# EAGLE board mem3-c (EAGLE 6.5.0)
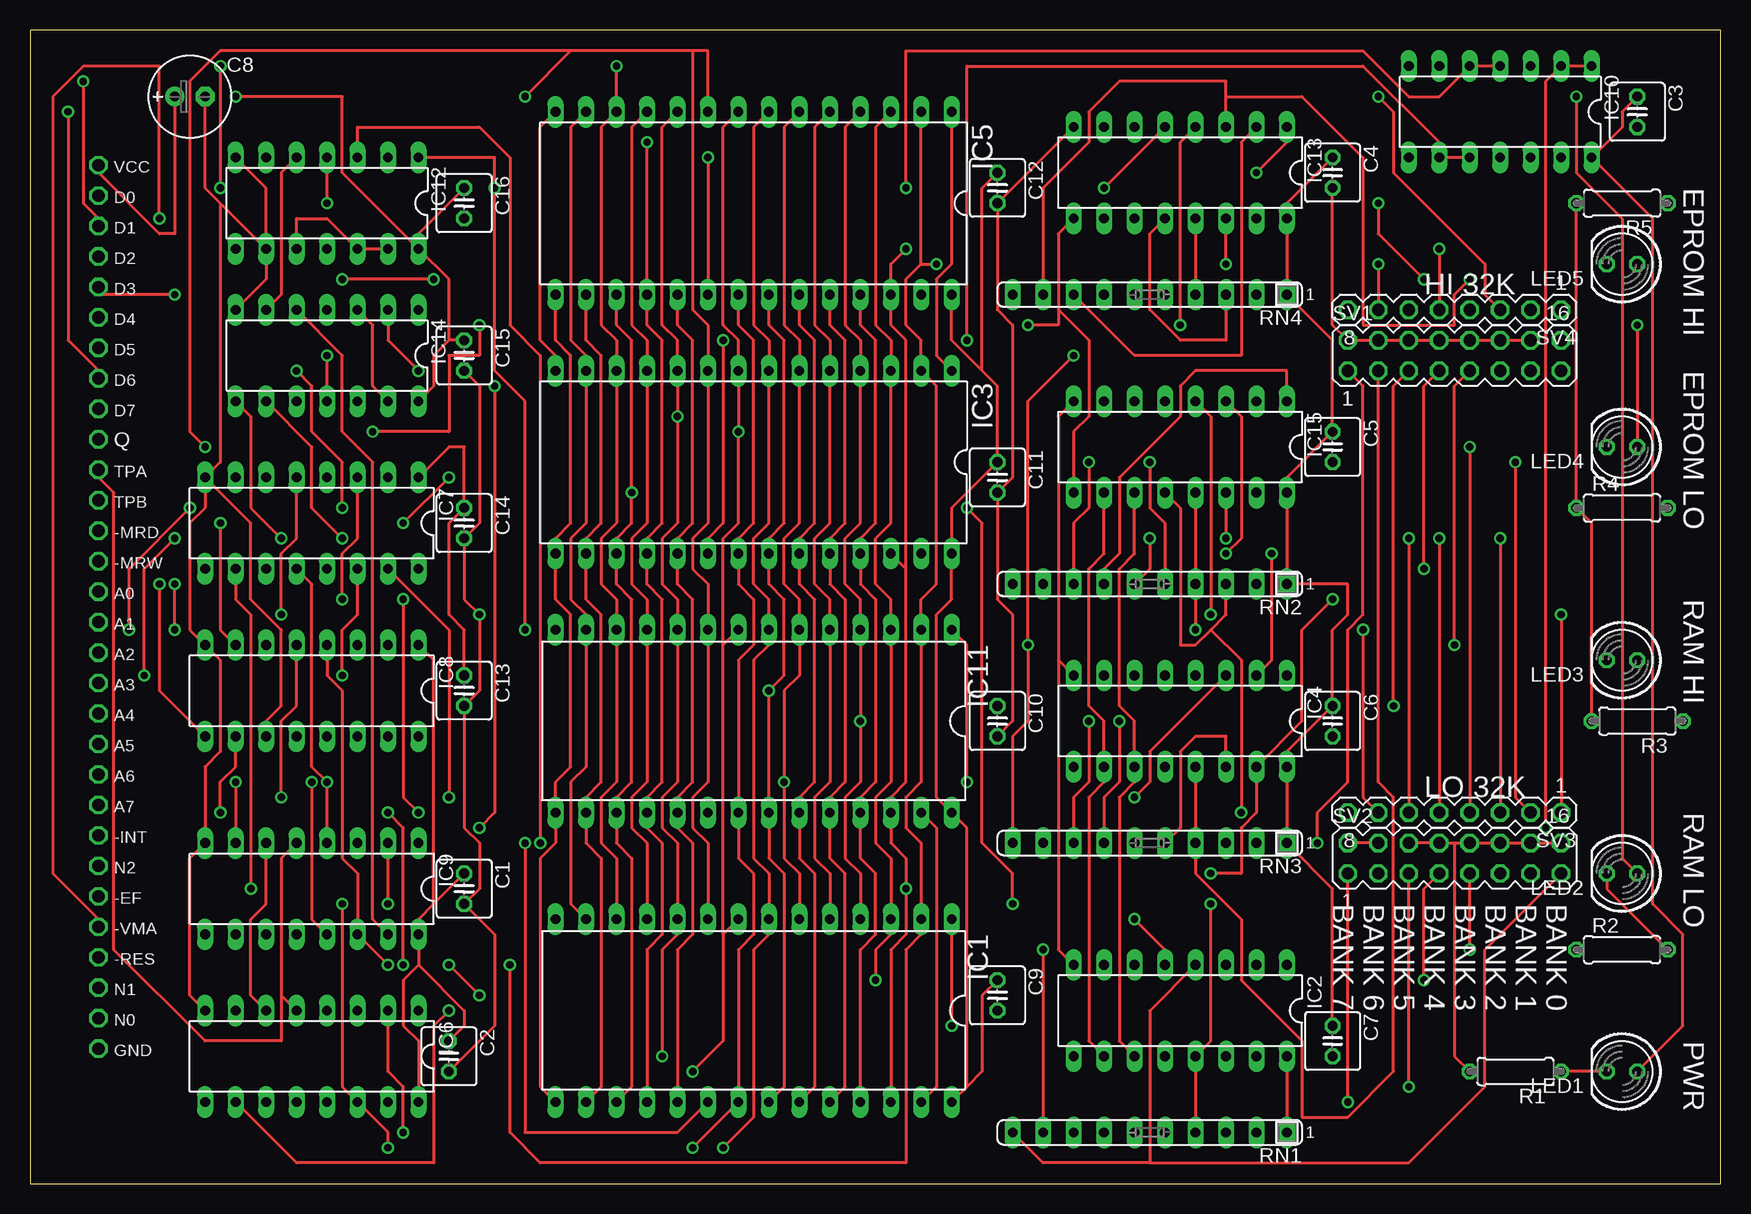
[diagram p0: board, top side]
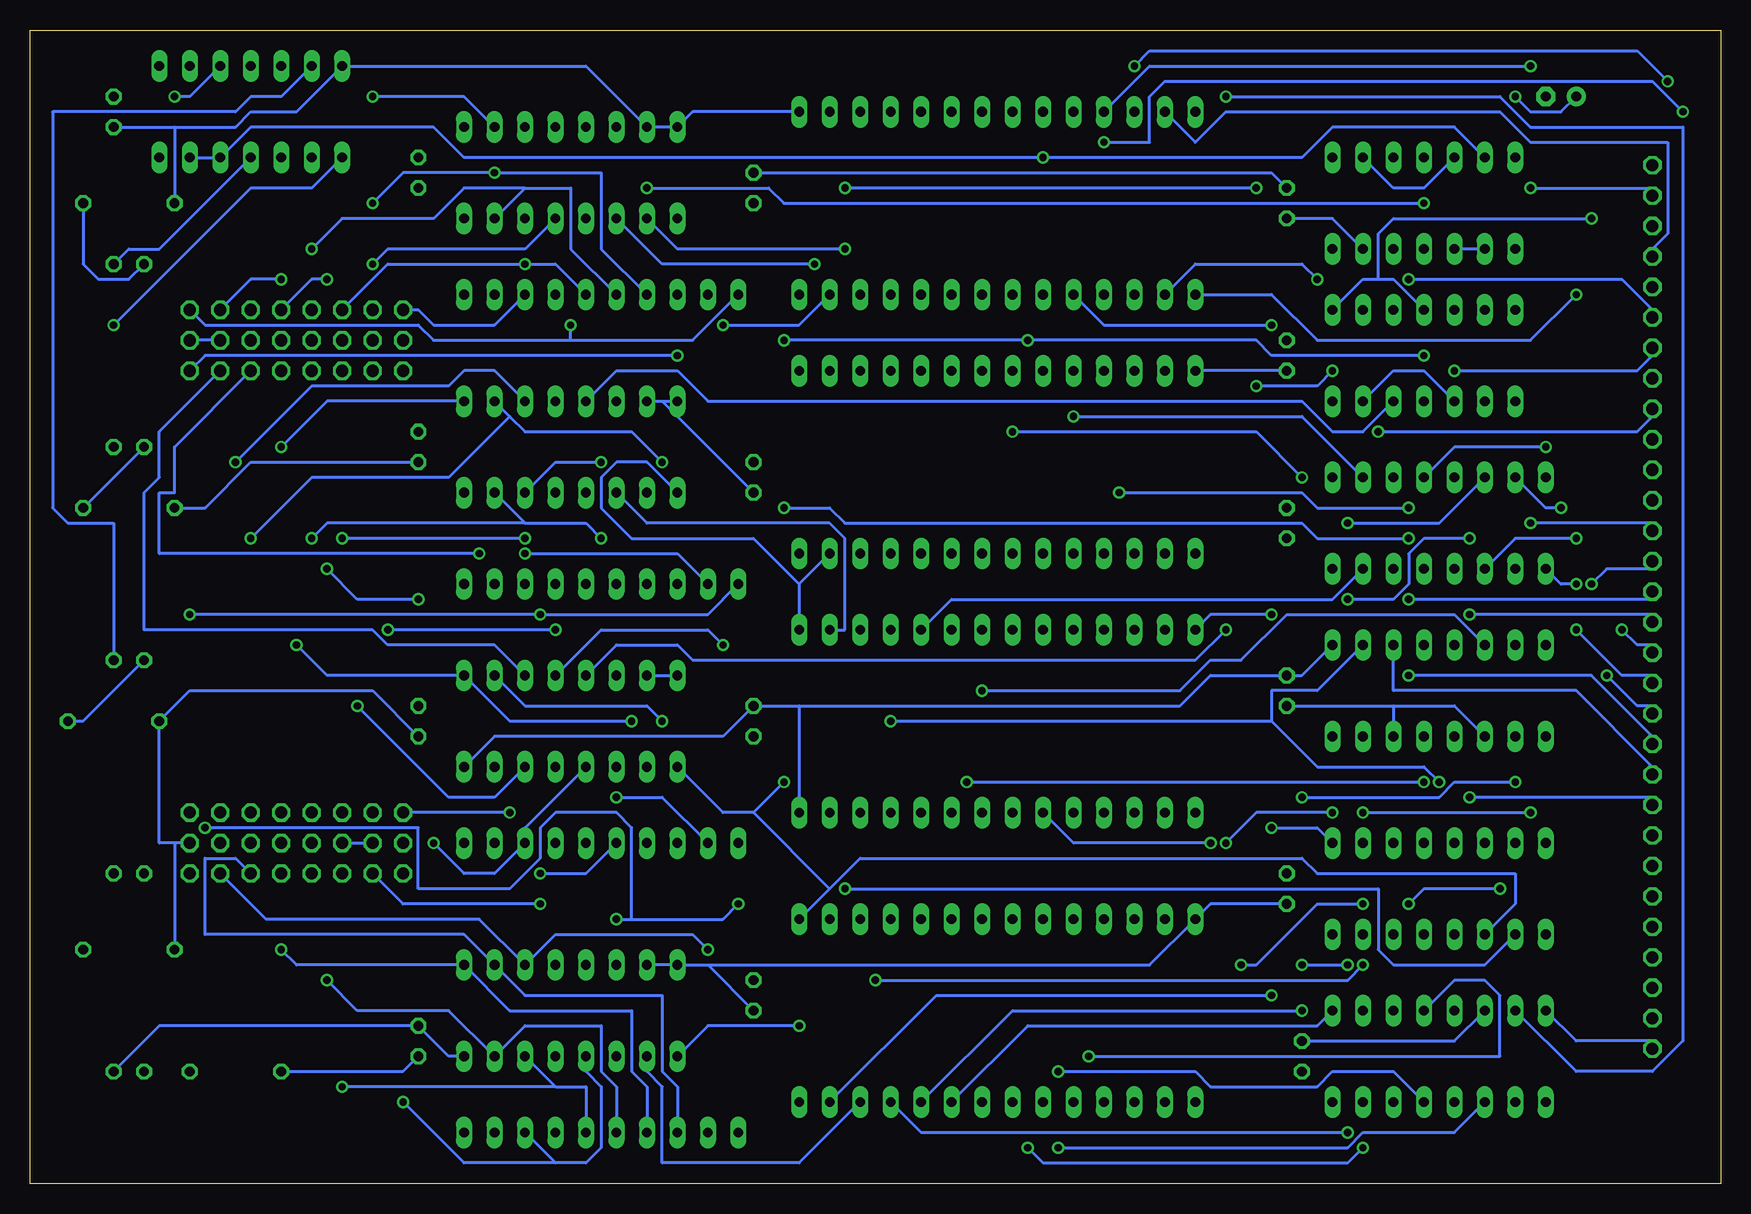
[diagram p1: board, bottom side, seen from below]

Size 140.95 x 96.19 mm. Coordinates in mm from the lower left corner, seen from the top.
Outline: 0,0 140.95,0 140.95,96.19 0,96.19 0,0
Copper layers (1*16): Top 0.035mm / dielectric 1.5mm / Bottom 0.035mm
Design rules "default": minimum track width 10mil, minimum drill 24mil, track to track 8mil, track to pad 8mil, pad to pad 8mil, via to via 8mil, smd to smd 8mil, copper to edge 40mil, drill to drill 8mil, minimum pad ring 10mil, minimum via ring 8mil, stop-mask expansion 4mil, vias tented up to drill 0mil, thermal gap 10mil

## Footprints (pad centres in the part's own frame; a part is rotated, then mirrored left to right if it is on the bottom)
C025-050X050 = drill 0.813 octagon: 1 -1.27,0; 2 1.27,0
E2,5-7 = drill 0.813 pad 1.6: + -1.27,0 | drill 0.813 pad 1.6 octagon: - 1.27,0
DIL28-6 = drill 0.813 long: 1 -16.51,-7.62; 2 -13.97,-7.62; 3 -11.43,-7.62; 4 -8.89,-7.62; 5 -6.35,-7.62; 6 -3.81,-7.62; 7 -1.27,-7.62; 8 1.27,-7.62; 9 3.81,-7.62; 10 6.35,-7.62; 11 8.89,-7.62; 12 11.43,-7.62; 13 13.97,-7.62; 14 16.51,-7.62; 15 16.51,7.62; 16 13.97,7.62; 17 11.43,7.62; 18 8.89,7.62; 19 6.35,7.62; 20 3.81,7.62; 21 1.27,7.62; 22 -1.27,7.62; 23 -3.81,7.62; 24 -6.35,7.62; 25 -8.89,7.62; 26 -11.43,7.62; 27 -13.97,7.62; 28 -16.51,7.62
DIL16 = drill 0.813 long: 1 -8.89,-3.81; 2 -6.35,-3.81; 3 -3.81,-3.81; 4 -1.27,-3.81; 5 1.27,-3.81; 6 3.81,-3.81; 7 6.35,-3.81; 8 8.89,-3.81; 9 8.89,3.81; 10 6.35,3.81; 11 3.81,3.81; 12 1.27,3.81; 13 -1.27,3.81; 14 -3.81,3.81; 15 -6.35,3.81; 16 -8.89,3.81
DIL28 = drill 0.813 long: 1 -16.51,-7.62; 2 -13.97,-7.62; 3 -11.43,-7.62; 4 -8.89,-7.62; 5 -6.35,-7.62; 6 -3.81,-7.62; 7 -1.27,-7.62; 8 1.27,-7.62; 9 3.81,-7.62; 10 6.35,-7.62; 11 8.89,-7.62; 12 11.43,-7.62; 13 13.97,-7.62; 14 16.51,-7.62; 15 16.51,7.62; 16 13.97,7.62; 17 11.43,7.62; 18 8.89,7.62; 19 6.35,7.62; 20 3.81,7.62; 21 1.27,7.62; 22 -1.27,7.62; 23 -3.81,7.62; 24 -6.35,7.62; 25 -8.89,7.62; 26 -11.43,7.62; 27 -13.97,7.62; 28 -16.51,7.62
DIL14 = drill 0.813 long: 1 -7.62,-3.81; 2 -5.08,-3.81; 3 -2.54,-3.81; 4 0,-3.81; 5 2.54,-3.81; 6 5.08,-3.81; 7 7.62,-3.81; 8 7.62,3.81; 9 5.08,3.81; 10 2.54,3.81; 11 0,3.81; 12 -2.54,3.81; 13 -5.08,3.81; 14 -7.62,3.81
LED5MM = drill 0.813 octagon: A -1.27,0; K 1.27,0
0207/7 = drill 0.813 octagon: 1 -3.81,0; 2 3.81,0
SIL10 = drill 0.813 long: 1 -11.43,0; 2 -8.89,0; 3 -6.35,0; 4 -3.81,0; 5 -1.27,0; 6 1.27,0; 7 3.81,0; 8 6.35,0; 9 8.89,0; 10 11.43,0
MA08-2 = drill 1.016 octagon: 1 -8.89,-1.27; 2 -8.89,1.27; 3 -6.35,-1.27; 4 -6.35,1.27; 5 -3.81,-1.27; 6 -3.81,1.27; 7 -1.27,-1.27; 8 -1.27,1.27; 9 1.27,-1.27; 10 1.27,1.27; 11 3.81,-1.27; 12 3.81,1.27; 13 6.35,-1.27; 14 6.35,1.27; 15 8.89,-1.27; 16 8.89,1.27
MA08-1 = drill 1.016 octagon: 1 -8.89,0; 2 -6.35,0; 3 -3.81,0; 4 -1.27,0; 5 1.27,0; 6 3.81,0; 7 6.35,0; 8 8.89,0
C30 = drill 1.016 octagon: 1 -36.83,0; 2 -34.29,0; 3 -31.75,0; 4 -29.21,0; 5 -26.67,0; 6 -24.13,0; 7 -21.59,0; 8 -19.05,0; 9 -16.51,0; 10 -13.97,0; 11 -11.43,0; 12 -8.89,0; 13 -6.35,0; 14 -3.81,0; 15 -1.27,0; 16 1.27,0; 17 3.81,0; 18 6.35,0; 19 8.89,0; 20 11.43,0; 21 13.97,0; 22 16.51,0; 23 19.05,0; 24 21.59,0; 25 24.13,0; 26 26.67,0; 27 29.21,0; 28 31.75,0; 29 34.29,0; 30 36.83,0

## Placement (x,y rotation side)
C1  .1  [C025-050X050]  36.19,24.6 270 top
C2  .1  [C025-050X050]  34.92,10.63 270 top
C3  .1  [C025-050X050]  133.98,89.37 270 top
C4  .1  [C025-050X050]  108.58,84.29 270 top
C5  .1  [C025-050X050]  108.58,61.43 270 top
C6  .1  [C025-050X050]  108.58,38.57 270 top
C7  .1  [C025-050X050]  108.58,11.9 270 top
C8  10.0  [E2,5-7]  13.33,90.64 0 top
C9  .1  [C025-050X050]  80.64,15.71 270 top
C10  .1  [C025-050X050]  80.64,38.57 270 top
C11  .1  [C025-050X050]  80.64,58.89 270 top
C12  .1  [C025-050X050]  80.64,83.02 270 top
C13  .1  [C025-050X050]  36.19,41.11 270 top
C14  .1  [C025-050X050]  36.19,55.08 270 top
C15  .1  [C025-050X050]  36.19,69.05 270 top
C16  .1  [C025-050X050]  36.19,81.75 270 top
IC1  62256  [DIL28-6]  60.32,14.44 180 top
IC2  74LS151N  [DIL16]  95.88,14.44 180 top
IC3  27256  [DIL28]  60.32,60.16 180 top
IC4  74LS151N  [DIL16]  95.88,38.57 180 top
IC5  27256  [DIL28]  60.32,81.75 180 top
IC6  4042N  [DIL16]  23.49,10.63 180 top
IC7  4050N  [DIL16]  23.49,55.08 180 top
IC8  4050N  [DIL16]  23.49,41.11 180 top
IC9  4042N  [DIL16]  23.49,24.6 180 top
IC10  74LS00N  [DIL14]  122.55,89.37 180 top
IC11  62256  [DIL28-6]  60.32,38.57 180 top
IC12  74LS32N  [DIL14]  24.76,81.75 180 top
IC13  74LS151N  [DIL16]  95.88,84.29 180 top
IC14  74LS32N  [DIL14]  24.76,69.05 180 top
IC15  74LS151N  [DIL16]  95.88,61.43 180 top
LED1  [LED5MM]  132.71,9.36 180 top
LED2  [LED5MM]  132.71,25.87 180 top
LED3  [LED5MM]  132.71,43.65 180 top
LED4  [LED5MM]  132.71,61.43 180 top
LED5  [LED5MM]  132.71,76.67 180 top
R1  470  [0207/7]  123.82,9.36 180 top
R2  470  [0207/7]  132.71,19.52 0 top
R3  470  [0207/7]  133.98,38.57 180 top
R4  470  [0207/7]  132.71,56.35 0 top
R5  470  [0207/7]  132.71,81.75 180 top
RN1  [SIL10]  93.34,4.28 180 top
RN2  [SIL10]  93.34,50 180 top
RN3  [SIL10]  93.34,28.41 180 top
RN4  [SIL10]  93.34,74.13 180 top
SV1  [MA08-2]  118.74,69.05 0 top
SV2  [MA08-2]  118.74,27.14 0 top
SV3  [MA08-1]  118.74,30.95 180 top
SV4  [MA08-1]  118.74,72.86 180 top
U$1  [C30]  5.71,48.09 270 top

## Library data of the parts
C1-C16 R1-R5 = rcl
IC1 IC11 = memory-hitachi
IC2 IC4 IC10 IC12-IC15 = 74xx-us
IC3 IC5 = memory
IC6-IC9 = 40xx
LED1-LED5 = led
RN1-RN4 = resistor-sil
SV1-SV4 = con-lstb
U$1 = k1

## Nets
BUFFADDR0: IC1.10 IC3.10 IC5.10 IC6.4 IC7.2 IC11.10
BUFFADDR1: IC1.9 IC3.9 IC5.9 IC6.7 IC7.4 IC11.9
BUFFADDR2: IC1.8 IC3.8 IC5.8 IC6.13 IC7.6 IC11.8
BUFFADDR3: IC1.7 IC3.7 IC5.7 IC6.14 IC7.10 IC11.7
BUFFADDR4: IC1.6 IC3.6 IC5.6 IC7.12 IC9.4 IC11.6
BUFFADDR5: IC1.5 IC3.5 IC5.5 IC7.15 IC9.7 IC11.5
BUFFADDR6: IC1.4 IC3.4 IC5.4 IC8.2 IC9.13 IC11.4
BUFFADDR7: IC1.3 IC3.3 IC5.3 IC8.4 IC9.14 IC11.3
BUFFADDR8: IC1.25 IC3.25 IC5.25 IC6.2 IC11.25
BUFFADDR9: IC1.24 IC3.24 IC5.24 IC6.10 IC11.24
BUFFADDR10: IC1.21 IC3.21 IC5.21 IC6.11 IC11.21
BUFFADDR11: IC1.23 IC3.23 IC5.23 IC6.1 IC11.23
BUFFADDR12: IC1.2 IC2.11 IC3.2 IC4.11 IC5.2 IC9.2 IC11.2 IC13.11 IC15.11
BUFFADDR13: IC1.26 IC2.10 IC3.26 IC4.10 IC5.26 IC9.10 IC11.26 IC13.10 IC15.10
BUFFADDR14: IC1.1 IC2.9 IC3.27 IC4.9 IC5.27 IC9.11 IC11.1 IC13.9 IC15.9
BUFFADDR15: IC9.1 IC14.2
BUSDATA0: IC1.11 IC3.11 IC5.11 IC11.11 U$1.2
BUSDATA1: IC1.12 IC3.12 IC5.12 IC11.12 U$1.3
BUSDATA2: IC1.13 IC3.13 IC5.13 IC11.13 U$1.4
BUSDATA3: IC1.15 IC3.15 IC5.15 IC11.15 U$1.5
BUSDATA4: IC1.16 IC3.16 IC5.16 IC11.16 U$1.6
BUSDATA5: IC1.17 IC3.17 IC5.17 IC11.17 U$1.7
BUSDATA6: IC1.18 IC3.18 IC5.18 IC11.18 U$1.8
BUSDATA7: IC1.19 IC3.19 IC5.19 IC11.19 U$1.9
GND: C1.2 C2.2 C3.2 C4.2 C5.2 C6.2 C7.2 C8.- C9.2 C10.2 C11.2 C12.2 C13.2 C14.2 C15.2 C16.2 IC1.14 IC2.7 IC2.8 IC3.1 IC3.14 IC4.7 IC4.8 IC5.1 IC5.14 IC6.8 IC7.8 IC8.8 IC8.11 IC8.14 IC9.8 IC10.7 IC11.14 IC12.7 IC12.9 IC12.10 IC12.12 IC12.13 IC13.7 IC13.8 IC14.7 IC15.7 IC15.8 R1.2 R2.1 R3.2 R4.1 R5.2 SV1.2 SV1.4 SV1.6 SV1.8 SV1.10 SV1.12 SV1.14 SV1.16 SV2.2 SV2.4 SV2.6 SV2.8 SV2.10 SV2.12 SV2.14 SV2.16 U$1.30
N$1: LED1.K R1.1
N$2: IC2.12 RN1.3 SV2.1
N$3: IC2.13 RN1.4 SV2.3
N$4: IC2.14 RN1.5 SV2.5
N$5: IC6.5 IC9.5 U$1.11
N$6: IC2.15 RN1.6 SV2.7
N$7: IC7.3 U$1.15
N$8: IC7.5 U$1.16
N$9: IC7.7 U$1.17
N$10: IC7.9 U$1.18
N$11: IC7.11 U$1.19
N$12: IC7.14 U$1.20
N$13: IC8.3 U$1.21
N$14: IC8.5 U$1.22
N$15: IC2.1 RN1.7 SV2.9
N$16: IC2.2 RN1.8 SV2.11
N$17: IC2.3 RN1.9 SV2.13
N$18: IC2.4 RN1.10 SV2.15
N$19: IC10.8 LED4.A
N$20: IC12.2 IC12.5 IC14.6
N$21: IC4.12 RN3.3 SV1.1
N$22: IC4.13 RN3.4 SV1.3
N$23: IC4.14 RN3.5 SV1.5
N$24: IC4.15 RN3.6 SV1.7
N$25: IC8.9 U$1.14
N$26: IC8.7 U$1.13
N$27: IC14.1 IC14.4 U$1.26
N$28: IC4.1 RN3.7 SV1.9
N$29: IC4.2 RN3.8 SV1.11
N$30: IC4.3 RN3.9 SV1.13
N$31: IC14.3 IC14.10 IC14.13
N$32: LED4.K R4.2
N$33: IC4.4 RN3.10 SV1.15
N$34: IC2.5 IC10.1 IC10.2 IC14.9
N$35: IC1.20 IC14.8
N$36: IC14.12 IC15.5
N$37: IC5.20 IC10.12 IC10.13 IC12.6
N$38: IC13.13 RN4.4 SV4.7
N$39: IC13.14 RN4.5 SV4.6
N$40: IC13.15 RN4.6 SV4.5
N$41: IC13.1 RN4.7 SV4.4
N$42: IC13.2 RN4.8 SV4.3
N$43: IC13.3 RN4.9 SV4.2
N$44: IC3.20 IC10.9 IC10.10 IC14.11
N$45: IC13.12 RN4.3 SV4.8
N$46: IC13.4 RN4.10 SV4.1
N$47: IC11.20 IC12.3
N$49: IC12.4 IC13.5
N$50: IC9.15 IC14.5
N$51: IC4.5 IC10.4 IC10.5 IC12.1
N$55: IC15.12 RN2.3 SV3.8
N$56: LED5.K R5.1
N$57: IC10.11 LED5.A
N$58: IC10.3 LED2.A
N$59: LED2.K R2.2
N$60: IC15.13 RN2.4 SV3.7
N$61: LED3.K R3.1
N$62: IC10.6 LED3.A
N$63: IC15.14 RN2.5 SV3.6
N$64: IC15.15 RN2.6 SV3.5
N$65: IC15.1 RN2.7 SV3.4
N$66: IC15.2 RN2.8 SV3.3
N$67: IC15.3 RN2.9 SV3.2
N$68: IC15.4 RN2.10 SV3.1
RD: IC1.22 IC3.22 IC5.22 IC8.6 IC11.22
VCC: C1.1 C2.1 C3.1 C4.1 C5.1 C6.1 C7.1 C8.+ C9.1 C10.1 C11.1 C12.1 C13.1 C14.1 C15.1 C16.1 IC1.28 IC2.16 IC3.28 IC4.16 IC5.28 IC6.6 IC6.16 IC7.1 IC8.1 IC9.6 IC9.16 IC10.14 IC11.28 IC12.14 IC13.16 IC14.14 IC15.16 LED1.A RN1.1 RN2.1 RN3.1 RN4.1 U$1.1
WR: IC1.27 IC8.10 IC11.27

## Tracks (layer width: path | path; a pad name or v marks a point on that pad's centre or on a via)
BUFFADDR0  (via drill 0.61)
  Top 0.254: v52.7,10.63 52.7,19.52 53.97,20.79 IC1.10 53.97,28.41 52.7,29.68 52.7,32.22 53.97,33.49 IC11.10 53.97,48.73 52.7,50 52.7,53.81 53.97,55.08 v53.97,63.97 IC3.10 53.97,70.32 52.7,71.59 52.7,88.1 IC5.10
  Bottom 0.254: IC6.4 22.22,16.98 19.68,16.98 18.41,15.71 18.41,10.63 v52.7,10.63 | IC7.2 34.92,63.97 v53.97,63.97
BUFFADDR1  (via drill 0.61)
  Top 0.254: IC1.9 56.51,28.41 55.24,29.68 55.24,32.22 56.51,33.49 IC11.9 56.51,50 55.24,51.27 55.24,53.81 56.51,55.08 IC3.9 56.51,71.59 55.24,72.86 55.24,94.45 | 45.08,94.45 v41.27,90.64 | 55.24,94.45 56.51,94.45 IC5.9 | 55.24,94.45 45.08,94.45 | v14.6,61.43 13.33,62.7 13.33,91.91 15.87,94.45 45.08,94.45
  Bottom 0.254: IC6.7 12.06,9.36 5.71,9.36 3.17,11.9 3.17,88.1 15.87,88.1 18.41,90.64 v41.27,90.64 | IC7.4 22.22,61.43 v14.6,61.43
BUFFADDR2  (via drill 0.61)
  Top 0.254: v34.92,58.89 v31.11,55.08 | IC5.8 57.78,88.1 57.78,71.59 59.05,70.32 IC3.8 v59.05,62.7 59.05,55.08 57.78,53.81 57.78,44.92 | v55.24,9.36 57.78,11.9 57.78,20.79 | IC1.8 57.78,20.79 | 57.78,44.92 IC11.8 | 57.78,20.79 57.78,44.92
  Bottom 0.254: IC7.6 23.49,55.08 v31.11,55.08 | v34.92,58.89 38.73,62.7 v59.05,62.7 | IC6.13 27.3,9.36 32.38,9.36 33.65,8.09 42.54,8.09 43.81,9.36 v55.24,9.36
BUFFADDR3  (via drill 0.61)
  Top 0.254: v26.03,23.33 26.03,8.09 IC6.14 29.84,4.28 v29.84,3.01 | v18.41,24.6 18.41,47.46 17.14,48.73 IC7.10 | IC5.7 60.32,88.1 60.32,71.59 61.59,70.32 IC3.7 61.59,55.08 60.32,53.81 60.32,50 61.59,48.73 IC11.7 61.59,44.92 60.32,43.65 60.32,27.14 61.59,25.87 IC1.7 61.59,20.79 60.32,19.52 60.32,5.55 v57.78,3.01
  Bottom 0.254: v26.03,23.33 24.76,24.6 v18.41,24.6 | v29.84,3.01 31.11,1.74 56.51,1.74 v57.78,3.01
BUFFADDR4  (via drill 0.61)
  Top 0.254: IC7.12 23.49,50 23.49,34.76 v24.76,33.49 IC9.4 | IC5.6 62.86,88.1 62.86,71.59 64.13,70.32 IC3.6 64.13,55.08 62.86,53.81 62.86,50 64.13,48.73 IC11.6 64.13,42.38 62.86,41.11 v62.86,33.49 62.86,27.14 64.13,25.87 IC1.6
  Bottom 0.254: v62.86,33.49 v24.76,33.49
BUFFADDR5  (via drill 0.61)
  Top 0.254: v17.14,33.49 IC9.7 | v34.92,32.22 34.92,46.19 IC7.15 | IC5.5 65.4,88.1 65.4,71.59 66.67,70.32 IC3.5 66.67,55.08 65.4,53.81 65.4,50 66.67,48.73 IC11.5 66.67,33.49 65.4,32.22 65.4,27.14 66.67,25.87 IC1.5
  Bottom 0.254: v17.14,33.49 22.22,33.49 23.49,32.22 v34.92,32.22 | IC7.15 32.38,48.73 64.13,48.73 IC11.5
BUFFADDR6  (via drill 0.61)
  Top 0.254: IC9.13 23.49,22.06 v23.49,33.49 | IC5.4 67.94,88.1 67.94,71.59 69.21,70.32 IC3.4 69.21,55.08 67.94,53.81 67.94,50 69.21,48.73 IC11.4 v69.21,38.57 69.21,33.49 67.94,32.22 67.94,27.14 69.21,25.87 IC1.4
  Bottom 0.254: v23.49,33.49 24.76,34.76 33.65,34.76 37.46,38.57 | 37.46,38.57 37.46,41.11 33.65,41.11 IC8.2 | v69.21,38.57 37.46,38.57
BUFFADDR7  (via drill 0.61)
  Top 0.254: IC8.4 24.76,42.38 26.03,41.11 26.03,27.14 27.3,25.87 IC9.14 v29.84,18.25 | IC5.3 70.48,88.1 70.48,71.59 71.75,70.32 IC3.3 71.75,55.08 70.48,53.81 70.48,50 71.75,48.73 IC11.3 71.75,33.49 70.48,32.22 70.48,28.41 71.75,27.14 IC1.3 71.75,20.79 70.48,19.52 v70.48,16.98
  Bottom 0.254: v29.84,18.25 31.11,16.98 v70.48,16.98
BUFFADDR8  (via drill 0.61)
  Top 0.254: IC5.25 69.21,71.59 70.48,70.32 70.48,55.08 69.21,53.81 IC3.25 69.21,50 70.48,48.73 70.48,33.49 69.21,32.22 IC11.25 69.21,27.14 70.48,25.87 70.48,20.79 69.21,19.52 IC1.25 | IC6.2 29.84,9.36 31.11,8.09 v31.11,4.28
  Bottom 0.254: v31.11,4.28 66.67,4.28 IC1.25
BUFFADDR9  (via drill 0.61)
  Top 0.254: IC5.24 66.67,71.59 67.94,70.32 67.94,55.08 66.67,53.81 IC3.24 66.67,50 67.94,48.73 67.94,33.49 66.67,32.22 IC11.24 66.67,27.14 67.94,25.87 67.94,8.09 IC1.24 | IC6.10 22.22,1.74 33.65,1.74 33.65,13.17 v34.92,14.44
  Bottom 0.254: v34.92,14.44 59.05,14.44 IC1.24
BUFFADDR10  (via drill 0.61)
  Top 0.254: v55.24,3.01 IC1.21 59.05,19.52 60.32,20.79 60.32,25.87 59.05,27.14 IC11.21 59.05,43.65 60.32,44.92 60.32,48.73 59.05,50 IC3.21 59.05,53.81 60.32,55.08 60.32,70.32 59.05,71.59 IC5.21
  Bottom 0.254: IC6.11 22.22,4.28 29.84,4.28 31.11,3.01 v55.24,3.01
BUFFADDR11
  Top 0.254: IC1.23 65.4,8.09 65.4,25.87 64.13,27.14 IC11.23 64.13,32.22 65.4,33.49 65.4,48.73 64.13,50 IC3.23 64.13,53.81 65.4,55.08 65.4,70.32 64.13,71.59 IC5.23
  Bottom 0.254: IC6.1 33.65,13.17 57.78,13.17 IC1.23
BUFFADDR12  (via drill 0.61)
  Top 0.254: IC2.11 90.8,11.9 90.8,32.22 92.07,33.49 IC4.11 92.07,38.57 90.8,39.84 90.8,51.27 92.07,52.54 IC15.11 | v29.84,23.33 IC9.2 | v40,18.25 40,4.28 42.54,1.74 73.02,1.74 73.02,19.52 74.29,20.79 IC1.2 74.29,28.41 73.02,29.68 73.02,32.22 74.29,33.49 IC11.2 74.29,48.73 75.56,50 75.56,66.51 IC3.2 74.29,70.32 73.02,71.59 73.02,75.4 74.29,76.67 | 74.29,76.67 IC5.2 | 74.29,76.67 v75.56,76.67
  Bottom 0.254: v29.84,23.33 33.65,23.33 38.73,18.25 v40,18.25 | IC13.11 88.26,76.67 v75.56,76.67 | IC15.11 89.53,55.08 74.29,55.08 73.02,53.81 73.02,46.19 IC11.2
BUFFADDR13  (via drill 0.61)
  Top 0.254: IC2.10 88.26,11.9 88.26,32.22 89.53,33.49 IC4.10 89.53,38.57 88.26,39.84 88.26,51.27 89.53,52.54 IC15.10 | IC1.26 71.75,19.52 73.02,20.79 v73.02,24.6 73.02,27.14 71.75,28.41 IC11.26 71.75,32.22 73.02,33.49 73.02,51.27 | 73.02,51.27 IC3.26 | 73.02,51.27 73.02,70.32 71.75,71.59 IC5.26 71.75,76.67 v73.02,77.94
  Bottom 0.254: IC9.10 19.68,18.25 27.3,18.25 28.57,19.52 28.57,24.6 v73.02,24.6 | IC13.10 86.99,77.94 v73.02,77.94 | IC2.10 89.53,9.36 88.26,8.09 88.26,1.74 76.83,1.74 IC1.26
BUFFADDR14  (via drill 0.61)
  Top 0.254: IC15.9 86.99,62.7 88.26,63.97 88.26,70.32 85.72,72.86 | 85.72,72.86 85.72,79.21 IC13.9 | v83.18,71.59 85.72,71.59 85.72,72.86 | IC1.1 v76.83,13.17 | IC11.1 78.1,44.92 v78.1,33.49
  Bottom 0.254: 76.83,50 IC11.1 | IC3.27 76.83,50 | IC5.27 76.83,71.59 v83.18,71.59 | 76.83,50 80.64,53.81 90.8,53.81 93.34,56.35 93.34,58.89 92.07,60.16 89.53,60.16 IC15.9 | IC9.11 17.14,23.33 17.14,25.87 33.65,25.87 34.92,27.14 71.75,27.14 74.29,24.6 | IC1.1 74.29,24.6 | IC2.9 84.45,13.17 v76.83,13.17 | IC4.9 83.18,30.95 80.64,30.95 | 74.29,24.6 80.64,30.95 | 80.64,30.95 v78.1,33.49
BUFFADDR15  (via drill 0.61)
  Top 0.254: v37.46,29.68 38.73,30.95 v38.73,66.51 | v32.38,67.78 29.84,70.32 IC14.2
  Bottom 0.254: IC9.1 33.65,29.68 v37.46,29.68 | v38.73,66.51 33.65,66.51 v32.38,67.78
BUSDATA0  (via drill 0.61)
  Top 0.254: IC1.11 51.43,28.41 50.16,29.68 50.16,32.22 51.43,33.49 IC11.11 51.43,48.73 50.16,50 50.16,53.81 51.43,55.08 IC3.11 51.43,70.32 50.16,71.59 50.16,88.1 IC5.11 | v15.87,93.18 v15.87,83.02
  Bottom 0.254: v15.87,83.02 5.71,83.02 U$1.2 | v15.87,93.18 47.62,93.18 IC5.11
BUSDATA1  (via drill 0.61)
  Top 0.254: IC1.12 48.89,27.14 47.62,28.41 47.62,32.22 48.89,33.49 IC11.12 48.89,48.73 47.62,50 47.62,53.81 48.89,55.08 IC3.12 48.89,70.32 47.62,71.59 47.62,88.1 IC5.12 v48.89,93.18 | v4.44,91.91 4.44,81.75 5.71,80.48 U$1.3
  Bottom 0.254: v4.44,91.91 6.98,94.45 47.62,94.45 v48.89,93.18
BUSDATA2
  Top 0.254: IC1.13 45.08,23.33 45.08,33.49 46.35,34.76 IC11.13 46.35,47.46 45.08,48.73 45.08,53.81 46.35,55.08 IC3.13 46.35,69.05 45.08,70.32 45.08,88.1 IC5.13
  Bottom 0.254: IC5.13 43.81,86.83 41.27,89.37 18.41,89.37 15.87,86.83 4.44,86.83 4.44,79.21 5.71,77.94 U$1.4
BUSDATA3  (via drill 0.61)
  Top 0.254: IC1.15 42.54,8.09 42.54,27.14 43.81,28.41 IC11.15 43.81,33.49 45.08,34.76 45.08,47.46 43.81,48.73 IC3.15 43.81,53.81 45.08,55.08 45.08,69.05 43.81,70.32 IC5.15 | v12.06,74.13 5.71,74.13 U$1.5
  Bottom 0.254: v12.06,74.13 15.87,70.32 33.65,70.32 37.46,74.13 IC5.15
BUSDATA4  (via drill 0.61)
  Top 0.254: IC1.16 47.62,8.09 47.62,27.14 46.35,28.41 IC11.16 46.35,32.22 47.62,33.49 47.62,47.46 46.35,48.73 IC3.16 46.35,53.81 47.62,55.08 47.62,69.05 46.35,70.32 IC5.16 | v33.65,75.4 v26.03,75.4
  Bottom 0.254: v26.03,75.4 8.25,75.4 5.71,72.86 U$1.6 | v33.65,75.4 34.92,76.67 43.81,76.67 IC5.16
BUSDATA5  (via drill 0.61)
  Top 0.254: IC1.17 50.16,8.09 50.16,27.14 48.89,28.41 IC11.17 48.89,32.22 50.16,33.49 50.16,48.73 48.89,50 IC3.17 48.89,53.81 50.16,55.08 v50.16,57.62 50.16,70.32 48.89,71.59 IC5.17 | v22.22,67.78 23.49,66.51 23.49,62.7 26.03,60.16 v26.03,56.35
  Bottom 0.254: v22.22,67.78 6.98,67.78 5.71,69.05 U$1.7 | v26.03,56.35 33.65,56.35 34.92,57.62 v50.16,57.62
BUSDATA6  (via drill 0.61)
  Top 0.254: IC1.18 51.43,19.52 52.7,20.79 52.7,28.41 51.43,29.68 IC11.18 51.43,32.22 52.7,33.49 52.7,48.73 51.43,50 IC3.18 51.43,53.81 52.7,55.08 52.7,70.32 51.43,71.59 IC5.18 v51.43,86.83 | v3.17,89.37 3.17,70.32 5.71,67.78 U$1.8
  Bottom 0.254: v3.17,89.37 5.71,91.91 46.35,91.91 47.62,90.64 47.62,86.83 v51.43,86.83
BUSDATA7  (via drill 0.61)
  Top 0.254: IC1.19 53.97,19.52 55.24,20.79 55.24,28.41 53.97,29.68 IC11.19 53.97,32.22 55.24,33.49 55.24,48.73 53.97,50 IC3.19 53.97,53.81 55.24,55.08 55.24,70.32 53.97,71.59 IC5.19 | v28.57,62.7 34.92,62.7 34.92,69.05 37.46,69.05 v37.46,71.59
  Bottom 0.254: v28.57,62.7 6.98,62.7 5.71,63.97 U$1.9 | v37.46,71.59 51.43,71.59 IC5.19
GND  (via drill 0.61)
  Top 0.254: IC6.8 13.33,15.71 13.33,27.14 IC9.8 14.6,34.76 15.87,36.03 15.87,43.65 IC8.8 13.33,46.19 13.33,55.08 14.6,56.35 IC7.8 | IC12.13 IC12.12 24.76,80.48 22.22,80.48 IC12.10 | IC14.7 19.68,75.4 IC12.9 | IC12.7 19.68,83.02 IC12.9 | C8.- 14.6,83.02 15.87,81.75 | IC12.9 15.87,81.75 | IC7.8 15.87,60.16 15.87,81.75 | C2.2 38.73,13.17 38.73,20.79 C1.2 37.46,24.6 37.46,28.41 36.19,29.68 C13.2 37.46,41.11 v37.46,47.46 36.19,48.73 C14.2 37.46,55.08 37.46,66.51 C15.2 | IC5.14 42.54,88.1 42.54,70.32 43.81,69.05 IC3.14 | C10.2 81.91,38.57 81.91,47.46 80.64,48.73 C11.2 81.91,58.89 81.91,71.59 80.64,72.86 C12.2 IC13.8 | 85.72,43.65 IC4.8 | 85.72,43.65 85.72,63.97 IC15.8 | IC2.8 85.72,19.52 85.72,43.65 | IC3.1 75.56,69.05 75.56,75.4 76.83,76.67 IC5.1 | C4.2 108.58,71.59 SV1.2 SV1.4 SV1.6 SV1.8 SV1.10 SV1.12 SV1.14 | SV2.4 SV2.2 | SV2.6 SV2.8 118.74,28.41 | 118.74,28.41 SV2.10 SV2.12 SV2.14 SV2.16 | R1.2 118.74,10.63 118.74,28.41 | R3.2 130.17,55.08 R4.1 128.9,70.32 | 128.9,70.32 R5.2 | 128.9,70.32 SV1.16 | IC7.8 18.41,55.08 18.41,48.73 20.95,46.19 20.95,39.84 19.68,38.57 IC8.11
  Bottom 0.254: IC6.8 12.06,11.9 5.71,11.9 U$1.30 | C16.2 32.38,80.48 IC12.13 | IC12.9 IC12.10 | C1.2 42.54,23.33 IC1.14 47.62,18.25 84.45,18.25 | IC8.11 22.22,39.84 27.3,39.84 | C13.2 27.3,39.84 | 27.3,39.84 IC8.14 | IC11.14 42.54,47.46 v37.46,47.46 | C15.2 IC3.14 | 84.45,18.25 C9.2 | 84.45,18.25 IC2.8 IC2.7 | IC4.7 IC4.8 | IC15.7 88.26,65.24 | 88.26,65.24 IC15.8 | 88.26,65.24 C11.2 | IC5.1 85.72,89.37 IC13.8 IC13.7 94.61,93.18 IC10.7 118.74,89.37 122.55,89.37 123.82,88.1 128.9,88.1 | SV1.14 SV1.16 | 128.9,88.1 R5.2 | C3.2 128.9,88.1 | C5.2 122.55,60.16 126.36,56.35 R4.1 | C6.2 112.39,41.11 127.63,41.11 R3.2 130.17,28.41 128.9,28.41 | C7.2 109.85,9.36 R1.2 | 128.9,28.41 R2.1 | SV2.16 128.9,28.41 | SV2.6 SV2.4
N$1
  Top 0.254: LED1.K R1.1
N$2  (via drill 0.61)
  Top 0.254: v109.85,6.82 SV2.1
  Bottom 0.254: 97.15,1.74 RN1.3 | 97.15,1.74 94.61,1.74 93.34,3.01 93.34,8.09 94.61,9.36 IC2.12 | v109.85,6.82 104.77,1.74 97.15,1.74
N$3  (via drill 0.61)
  Top 0.254: RN1.4 IC2.13 98.42,11.9 v98.42,23.33
  Bottom 0.254: SV2.3 109.85,23.33 v98.42,23.33
N$4  (via drill 0.61)
  Top 0.254: v114.93,8.09 SV2.5
  Bottom 0.254: RN1.5 94.61,8.09 97.15,8.09 | IC2.14 97.15,8.09 | 97.15,8.09 v114.93,8.09
N$5
  Top 0.254: 20.95,15.71 IC6.5 | 20.95,15.71 20.95,27.14 IC9.5 | 20.95,15.71 20.95,11.9 14.6,11.9 6.98,19.52 6.98,57.62 5.71,58.89 U$1.11
N$6  (via drill 0.61)
  Top 0.254: SV2.7 116.2,24.6 v116.2,16.98
  Bottom 0.254: RN1.6 92.07,8.09 93.34,9.36 93.34,13.17 99.69,13.17 IC2.15 106.04,14.44 113.66,14.44 v116.2,16.98
N$7  (via drill 0.61)
  Top 0.254: IC7.3 27.3,53.81 26.03,52.54 v26.03,48.73
  Bottom 0.254: v26.03,48.73 5.71,48.73 U$1.15
N$8  (via drill 0.61)
  Top 0.254: IC7.5 22.22,53.81 20.95,52.54 v20.95,47.46
  Bottom 0.254: v20.95,47.46 5.71,47.46 U$1.16
N$9  (via drill 0.61)
  Top 0.254: v13.33,56.35 8.25,51.27 v8.25,46.19
  Bottom 0.254: IC7.7 14.6,56.35 v13.33,56.35 | v8.25,46.19 6.98,44.92 5.71,44.92 U$1.17
N$10  (via drill 0.61)
  Top 0.254: v12.06,46.19 v12.06,50
  Bottom 0.254: IC7.9 13.33,50 v12.06,50 | v12.06,46.19 8.25,42.38 5.71,42.38 U$1.18
N$11  (via drill 0.61)
  Top 0.254: v12.06,53.81 9.52,51.27 v9.52,42.38
  Bottom 0.254: IC7.11 17.14,53.81 v12.06,53.81 | v9.52,42.38 6.98,39.84 5.71,39.84 U$1.19
N$12  (via drill 0.61)
  Top 0.254: IC7.14 27.3,47.46 26.03,46.19 v26.03,42.38
  Bottom 0.254: v26.03,42.38 10.79,42.38 5.71,37.3 U$1.20
N$13
  Bottom 0.254: IC8.3 27.3,41.11 12.06,41.11 5.71,34.76 U$1.21
N$14  (via drill 0.61)
  Top 0.254: IC8.5 22.22,39.84 20.95,38.57 v20.95,32.22
  Bottom 0.254: v20.95,32.22 5.71,32.22 U$1.22
N$15  (via drill 0.61)
  Top 0.254: v120.01,19.52 SV2.9
  Bottom 0.254: RN1.7 89.53,8.09 90.8,9.36 90.8,14.44 100.96,14.44 IC2.1 118.74,18.25 v120.01,19.52
N$16
  Bottom 0.254: RN1.8 86.99,8.09 88.26,9.36 88.26,15.71 99.69,15.71 IC2.2 104.77,20.79 126.36,20.79 126.36,27.14 123.82,27.14 SV2.11
N$17  (via drill 0.61)
  Top 0.254: v84.45,19.52 RN1.9
  Bottom 0.254: v84.45,19.52 85.72,20.79 97.15,20.79 IC2.3 103.5,22.06 121.28,22.06 SV2.13
N$18
  Top 0.254: RN1.10 84.45,1.74 93.34,1.74 | 93.34,1.74 93.34,14.44 IC2.4 | SV2.15 121.28,19.52 121.28,8.09 114.93,1.74 93.34,1.74
N$19  (via drill 0.61)
  Top 0.254: v133.98,71.59 LED4.A
  Bottom 0.254: v133.98,71.59 122.55,83.02 117.47,83.02 IC10.8
N$20
  Top 0.254: IC14.6 20.95,74.13 20.95,84.29 IC12.5
  Bottom 0.254: IC12.2 27.3,83.02 24.76,83.02 IC12.5
N$21  (via drill 0.61)
  Top 0.254: SV1.1 111.12,66.51 111.12,47.46 109.85,46.19 109.85,33.49 107.31,30.95 v107.31,28.41
  Bottom 0.254: IC4.12 99.69,29.68 RN3.3 102.23,25.87 104.77,25.87 v107.31,28.41
N$22
  Top 0.254: IC4.13 RN3.4 97.15,25.87 100.96,22.06 100.96,16.98 106.04,11.9 106.04,5.55 109.85,5.55 113.66,9.36 113.66,32.22 112.39,33.49 SV1.3
N$23  (via drill 0.61)
  Top 0.254: RN3.5 95.88,29.68 95.88,36.03 97.15,37.3 99.69,37.3 IC4.14 | SV1.5 113.66,66.51 v113.66,39.84
  Bottom 0.254: v113.66,39.84 106.04,32.22 102.23,32.22 IC4.14
N$24  (via drill 0.61)
  Top 0.254: v98.42,25.87 100.96,25.87 100.96,29.68 102.23,30.95 IC4.15 106.04,38.57 106.04,46.19 v108.58,48.73 | SV1.7 116.2,66.51 v116.2,51.27
  Bottom 0.254: RN3.6 94.61,25.87 v98.42,25.87 | v116.2,51.27 113.66,48.73 v108.58,48.73
N$25  (via drill 0.61)
  Top 0.254: IC8.9 10.79,41.11 v10.79,50
  Bottom 0.254: v10.79,50 9.52,51.27 5.71,51.27 U$1.14
N$26  (via drill 0.61)
  Top 0.254: IC8.7 15.87,46.19 v15.87,55.08
  Bottom 0.254: v15.87,55.08 5.71,55.08 U$1.13
N$27  (via drill 0.61)
  Top 0.254: v10.79,80.48 10.79,93.18 4.44,93.18 1.9,90.64 1.9,25.87 5.71,22.06 U$1.26
  Bottom 0.254: IC14.4 27.3,75.4 28.57,75.4 | 28.57,75.4 29.84,75.4 IC14.1 | v10.79,80.48 27.3,80.48 28.57,79.21 28.57,75.4
N$28  (via drill 0.61)
  Top 0.254: RN3.7 89.53,32.22 90.8,33.49 v90.8,38.57 | SV1.9 118.74,66.51 v118.74,44.92
  Bottom 0.254: v90.8,38.57 100.96,38.57 IC4.1 116.2,42.38 v118.74,44.92
N$29  (via drill 0.61)
  Top 0.254: RN3.8 86.99,32.22 88.26,33.49 v88.26,38.57 | v103.5,52.54 103.5,43.65 IC4.2
  Bottom 0.254: v88.26,38.57 89.53,39.84 99.69,39.84 IC4.2 | SV1.11 128.9,61.43 128.9,57.62 130.17,57.62 130.17,52.54 v103.5,52.54
N$30  (via drill 0.61)
  Top 0.254: v92.07,32.22 93.34,33.49 93.34,36.03 IC4.3
  Bottom 0.254: RN3.9 88.26,32.22 v92.07,32.22 | SV1.13 130.17,62.7 130.17,58.89 131.44,57.62 131.44,46.19 112.39,46.19 111.12,44.92 102.23,44.92 IC4.3
N$31
  Top 0.254: IC14.3 28.57,71.59 28.57,66.51 IC14.13
  Bottom 0.254: IC14.10 24.76,67.78 27.3,67.78 IC14.13
N$32
  Bottom 0.254: LED4.K R4.2
N$33  (via drill 0.61)
  Top 0.254: RN3.10 81.91,37.3 83.18,38.57 v83.18,44.92 83.18,65.24 v86.99,69.05
  Bottom 0.254: v83.18,44.92 84.45,46.19 93.34,46.19 IC4.4 | SV1.15 126.36,69.05 v86.99,69.05
N$34  (via drill 0.61)
  Top 0.254: IC10.1 IC10.2 126.36,91.91 v126.36,29.68 | IC14.9 23.49,61.43 23.49,56.35 v26.03,53.81 | v78.1,56.35 79.37,55.08 79.37,28.41 81.91,25.87 v81.91,23.33 | v92.07,22.06 94.61,19.52 IC2.5
  Bottom 0.254: v26.03,53.81 33.65,53.81 34.92,55.08 73.02,55.08 74.29,56.35 v78.1,56.35 | v81.91,23.33 83.18,22.06 90.8,22.06 | v92.07,22.06 90.8,22.06 | v126.36,29.68 108.58,29.68 108.58,24.6 100.96,24.6 98.42,27.14 98.42,29.68 97.15,30.95 92.07,30.95 90.8,29.68 90.8,22.06
N$35  (via drill 0.61)
  Top 0.254: IC1.20 53.97,4.28 41.27,4.28 v41.27,28.41 | v32.38,30.95 31.11,32.22 v31.11,48.73 | v20.95,53.81 18.41,56.35 18.41,63.97 IC14.8
  Bottom 0.254: v41.27,28.41 38.73,30.95 v32.38,30.95 | v31.11,48.73 27.3,48.73 26.03,50 26.03,52.54 24.76,53.81 v20.95,53.81
N$36
  Bottom 0.254: IC14.12 29.84,62.7 32.38,62.7 34.92,65.24 84.45,65.24 86.99,67.78 92.07,67.78 IC15.5
N$37  (via drill 0.61)
  Top 0.254: v56.51,85.56 IC5.20
  Bottom 0.254: IC10.13 IC10.12 122.55,88.1 107.31,88.1 104.77,85.56 v56.51,85.56 34.92,85.56 32.38,88.1 22.22,88.1 IC12.6
N$38  (via drill 0.61)
  Top 0.254: IC13.13 RN4.4 | v112.39,76.67 SV4.7
  Bottom 0.254: v112.39,76.67 111.12,77.94 99.69,77.94 IC13.13
N$39  (via drill 0.61)
  Top 0.254: v99.69,76.67 IC13.14
  Bottom 0.254: RN4.5 97.15,76.67 v99.69,76.67 111.12,76.67 SV4.6
N$40  (via drill 0.61)
  Top 0.254: v117.47,77.94 SV4.5
  Bottom 0.254: RN4.6 95.88,77.94 95.88,83.02 99.69,83.02 | IC13.15 99.69,83.02 | v117.47,77.94 114.93,80.48 107.31,80.48 104.77,83.02 99.69,83.02
N$41  (via drill 0.61)
  Top 0.254: v102.23,84.29 104.77,86.83 IC13.1 | v116.2,75.4 112.39,79.21 v112.39,81.75
  Bottom 0.254: RN4.7 93.34,77.94 93.34,84.29 v102.23,84.29 109.85,84.29 v112.39,81.75 | SV4.4 117.47,75.4 v116.2,75.4
N$42  (via drill 0.61)
  Top 0.254: RN4.8 92.07,69.05 100.96,69.05 100.96,86.83 IC13.2 | SV4.3 121.28,74.13 121.28,76.67 113.66,84.29 113.66,89.37 v112.39,90.64
  Bottom 0.254: v112.39,90.64 104.77,90.64 IC13.2
N$43  (via drill 0.61)
  Top 0.254: RN4.9 84.45,83.02 88.26,86.83 88.26,89.37 90.8,91.91 99.69,91.91 99.69,90.64 | IC13.3 99.69,90.64 | v120.01,75.4 118.74,74.13 118.74,71.59 111.12,71.59 111.12,85.56 106.04,90.64 99.69,90.64
  Bottom 0.254: SV4.2 122.55,75.4 v120.01,75.4
N$44  (via drill 0.61)
  Top 0.254: IC10.10 IC10.9 117.47,86.83 111.12,93.18 78.1,93.18 v78.1,70.32 | IC3.20 56.51,53.81 57.78,55.08 v57.78,70.32 | IC14.11 v24.76,69.05
  Bottom 0.254: v24.76,69.05 37.46,69.05 38.73,70.32 v57.78,70.32 v78.1,70.32
N$45
  Top 0.254: IC13.12 93.34,79.21 93.34,72.86 95.88,70.32 99.69,70.32 RN4.3
  Bottom 0.254: RN4.3 102.23,71.59 107.31,71.59 108.58,72.86 SV4.8
N$46  (via drill 0.61)
  Top 0.254: IC13.4 95.88,86.83 v95.88,71.59
  Bottom 0.254: RN4.10 85.72,70.32 95.88,70.32 | 95.88,70.32 107.31,70.32 108.58,71.59 126.36,71.59 SV4.1 | 95.88,70.32 v95.88,71.59
N$47  (via drill 0.61)
  Top 0.254: v42.54,28.41 42.54,69.05 40,71.59 40,85.56 37.46,88.1 27.3,88.1 IC12.3
  Bottom 0.254: IC11.20 53.97,28.41 v42.54,28.41
N$49  (via drill 0.61)
  Top 0.254: v24.76,81.75 IC12.4 | IC13.5 v89.53,83.02
  Bottom 0.254: v24.76,81.75 78.1,81.75 79.37,83.02 v89.53,83.02
N$50
  Top 0.254: IC14.5 26.03,69.05 26.03,62.7 28.57,60.16 28.57,22.06 IC9.15
N$51  (via drill 0.61)
  Top 0.254: IC10.4 IC10.5 117.47,90.64 114.93,90.64 111.12,94.45 73.02,94.45 v73.02,83.02 | IC12.1 38.73,85.56 v38.73,83.02 38.73,67.78 41.27,65.24 v41.27,46.19
  Bottom 0.254: v41.27,46.19 43.81,43.65 85.72,43.65 86.99,44.92 92.07,44.92 IC4.5 | v38.73,83.02 v73.02,83.02
N$55  (via drill 0.61)
  Top 0.254: RN2.3 99.69,47.46 98.42,46.19 | 98.42,46.19 97.15,44.92 95.88,44.92 95.88,56.35 IC15.12 | v100.96,30.95 100.96,43.65 98.42,46.19
  Bottom 0.254: v100.96,30.95 SV3.8
N$56
  Bottom 0.254: LED5.K 132.71,75.4 135.25,75.4 136.52,76.67 R5.1
N$57
  Bottom 0.254: IC10.11 130.17,77.94 132.71,77.94 LED5.A
N$58  (via drill 0.61)
  Top 0.254: LED2.A 132.71,27.14 132.71,80.48 128.9,84.29 v128.9,90.64
  Bottom 0.254: v128.9,90.64 127.63,90.64 IC10.3
N$59
  Top 0.254: R2.2 131.44,24.6 LED2.K
N$60  (via drill 0.61)
  Top 0.254: IC15.13 RN2.4 v97.15,46.19 | SV3.7 111.12,32.22 v111.12,46.19
  Bottom 0.254: v97.15,46.19 v111.12,46.19
N$61
  Bottom 0.254: LED3.K 136.52,38.57 R3.1
N$62
  Bottom 0.254: LED3.A 133.98,55.08 137.79,55.08 139.06,56.35 139.06,89.37 123.82,89.37 122.55,90.64 120.01,90.64 IC10.6
N$63  (via drill 0.61)
  Top 0.254: RN2.5 94.61,55.08 93.34,56.35 v93.34,60.16 | v114.93,53.81 SV3.6 | IC15.14 v99.69,53.81
  Bottom 0.254: v93.34,60.16 97.15,60.16 IC15.14 | v99.69,53.81 v114.93,53.81
N$64  (via drill 0.61)
  Top 0.254: RN2.6 93.34,51.27 v93.34,53.81 | v117.47,53.81 SV3.5
  Bottom 0.254: v93.34,53.81 94.61,55.08 99.69,55.08 | IC15.15 99.69,55.08 | v117.47,53.81 116.2,55.08 99.69,55.08
N$65  (via drill 0.61)
  Top 0.254: RN2.7 89.53,51.27 90.8,52.54 90.8,58.89 95.88,63.97 95.88,66.51 97.15,67.78 104.77,67.78 IC15.1 | v120.01,61.43 SV3.4
  Bottom 0.254: v120.01,61.43 116.2,65.24 IC15.1
N$66  (via drill 0.61)
  Top 0.254: RN2.8 86.99,55.08 88.26,56.35 v88.26,60.16 | v122.55,53.81 SV3.3
  Bottom 0.254: v88.26,60.16 90.8,62.7 99.69,62.7 100.96,63.97 | IC15.2 100.96,63.97 | v122.55,53.81 117.47,58.89 106.04,58.89 100.96,63.97
N$67  (via drill 0.61)
  Top 0.254: v99.69,52.54 100.96,53.81 100.96,63.97 IC15.3 | SV3.2 123.82,32.22 v123.82,60.16
  Bottom 0.254: RN2.9 86.99,52.54 v99.69,52.54 | v123.82,60.16 117.47,66.51 106.04,66.51 104.77,67.78 102.23,67.78 IC15.3
N$68  (via drill 0.61)
  Top 0.254: v98.42,47.46 98.42,63.97 IC15.4 | v127.63,47.46 SV3.1
  Bottom 0.254: RN2.10 84.45,47.46 v98.42,47.46 v127.63,47.46
RD  (via drill 0.61)
  Top 0.254: IC1.22 62.86,8.09 62.86,25.87 61.59,27.14 IC11.22 v61.59,41.11 62.86,42.38 62.86,48.73 61.59,50 IC3.22 61.59,53.81 62.86,55.08 62.86,70.32 61.59,71.59 IC5.22
  Bottom 0.254: IC8.6 22.22,47.46 36.19,47.46 40,43.65 42.54,43.65 45.08,41.11 v61.59,41.11
VCC  (via drill 0.61)
  Top 0.254: C4.1 104.77,81.75 IC13.16 RN4.1 108.58,70.32 C5.1 104.77,58.89 IC15.16 RN2.1 109.85,50 109.85,47.46 108.58,46.19 C6.1 104.77,36.03 IC4.16 RN3.1 108.58,24.6 C7.1 | C3.1 132.71,89.37 132.71,88.1 IC10.14 135.25,80.48 135.25,23.33 137.79,20.79 137.79,13.17 LED1.A | IC2.16 RN1.1 | C13.1 36.19,46.19 34.92,47.46 34.92,55.08 C14.1 36.19,61.43 34.92,61.43 IC7.1 | IC6.16 32.38,11.9 31.11,13.17 31.11,16.98 32.38,18.25 | 32.38,18.25 IC9.16 32.38,22.06 33.65,23.33 | C2.1 36.19,13.17 36.19,14.44 32.38,18.25 | 33.65,23.33 C1.1 | IC9.6 19.68,23.33 18.41,22.06 18.41,15.71 IC6.6 | IC8.1 33.65,43.65 33.65,23.33 | C8.+ 12.06,79.21 10.79,79.21 5.71,84.29 U$1.1 | IC14.14 33.65,66.51 33.65,69.05 34.92,70.32 | C15.1 34.92,70.32 | IC12.14 34.92,75.4 34.92,70.32 | C16.1 32.38,79.21 IC12.14 | v17.14,90.64 26.03,90.64 26.03,84.29 IC12.14 | IC5.28 76.83,70.32 79.37,67.78 | 79.37,67.78 80.64,66.51 C11.1 76.83,56.35 IC3.28 76.83,48.73 75.56,47.46 75.56,32.22 IC11.28 78.1,29.68 78.1,8.09 | C12.1 79.37,83.02 79.37,67.78 | 78.1,8.09 79.37,9.36 79.37,15.71 C9.1 | 78.1,8.09 IC1.28
  Bottom 0.254: IC2.16 106.04,10.63 C7.1 130.17,13.17 LED1.A | IC8.1 34.92,42.38 C13.1 42.54,42.38 45.08,39.84 76.83,39.84 | IC6.6 22.22,11.9 C2.1 | C8.+ 13.33,89.37 15.87,89.37 v17.14,90.64 | 76.83,39.84 IC11.28 | 76.83,39.84 C10.1 83.18,37.3 102.23,37.3 IC4.16 | C16.1 37.46,84.29 C12.1
WR  (via drill 0.61)
  Top 0.254: IC1.27 75.56,8.09 75.56,29.68 IC11.27 | IC8.10 17.14,34.76 15.87,33.49 v15.87,30.95 | v29.84,30.95 31.11,29.68 v31.11,18.25 | v37.46,15.71 v34.92,18.25
  Bottom 0.254: v29.84,30.95 v15.87,30.95 | v34.92,18.25 v31.11,18.25 | v37.46,15.71 65.4,15.71 IC1.27

## Text on the board
tNames: EPROM HI | HI 32K | EPROM LO | RAM HI | LO 32K | RAM LO | BANK 7 | BANK 6 | BANK 5 | BANK 4 | BANK 3 | BANK 2 | BANK 1 | BANK 0 | PWR